# Altium PCB IMU to servo.pcbdoc
Units mil, origin at the board's own origin, x right, y up, seen from the top; angles counter-clockwise.
Board outline 1070.87 x 1248.03 mil, 2 copper layers (Top Layer, Bottom Layer), stack 62.206 mil thick; 35 components, 27 nets, 116 pads, 48 vias.
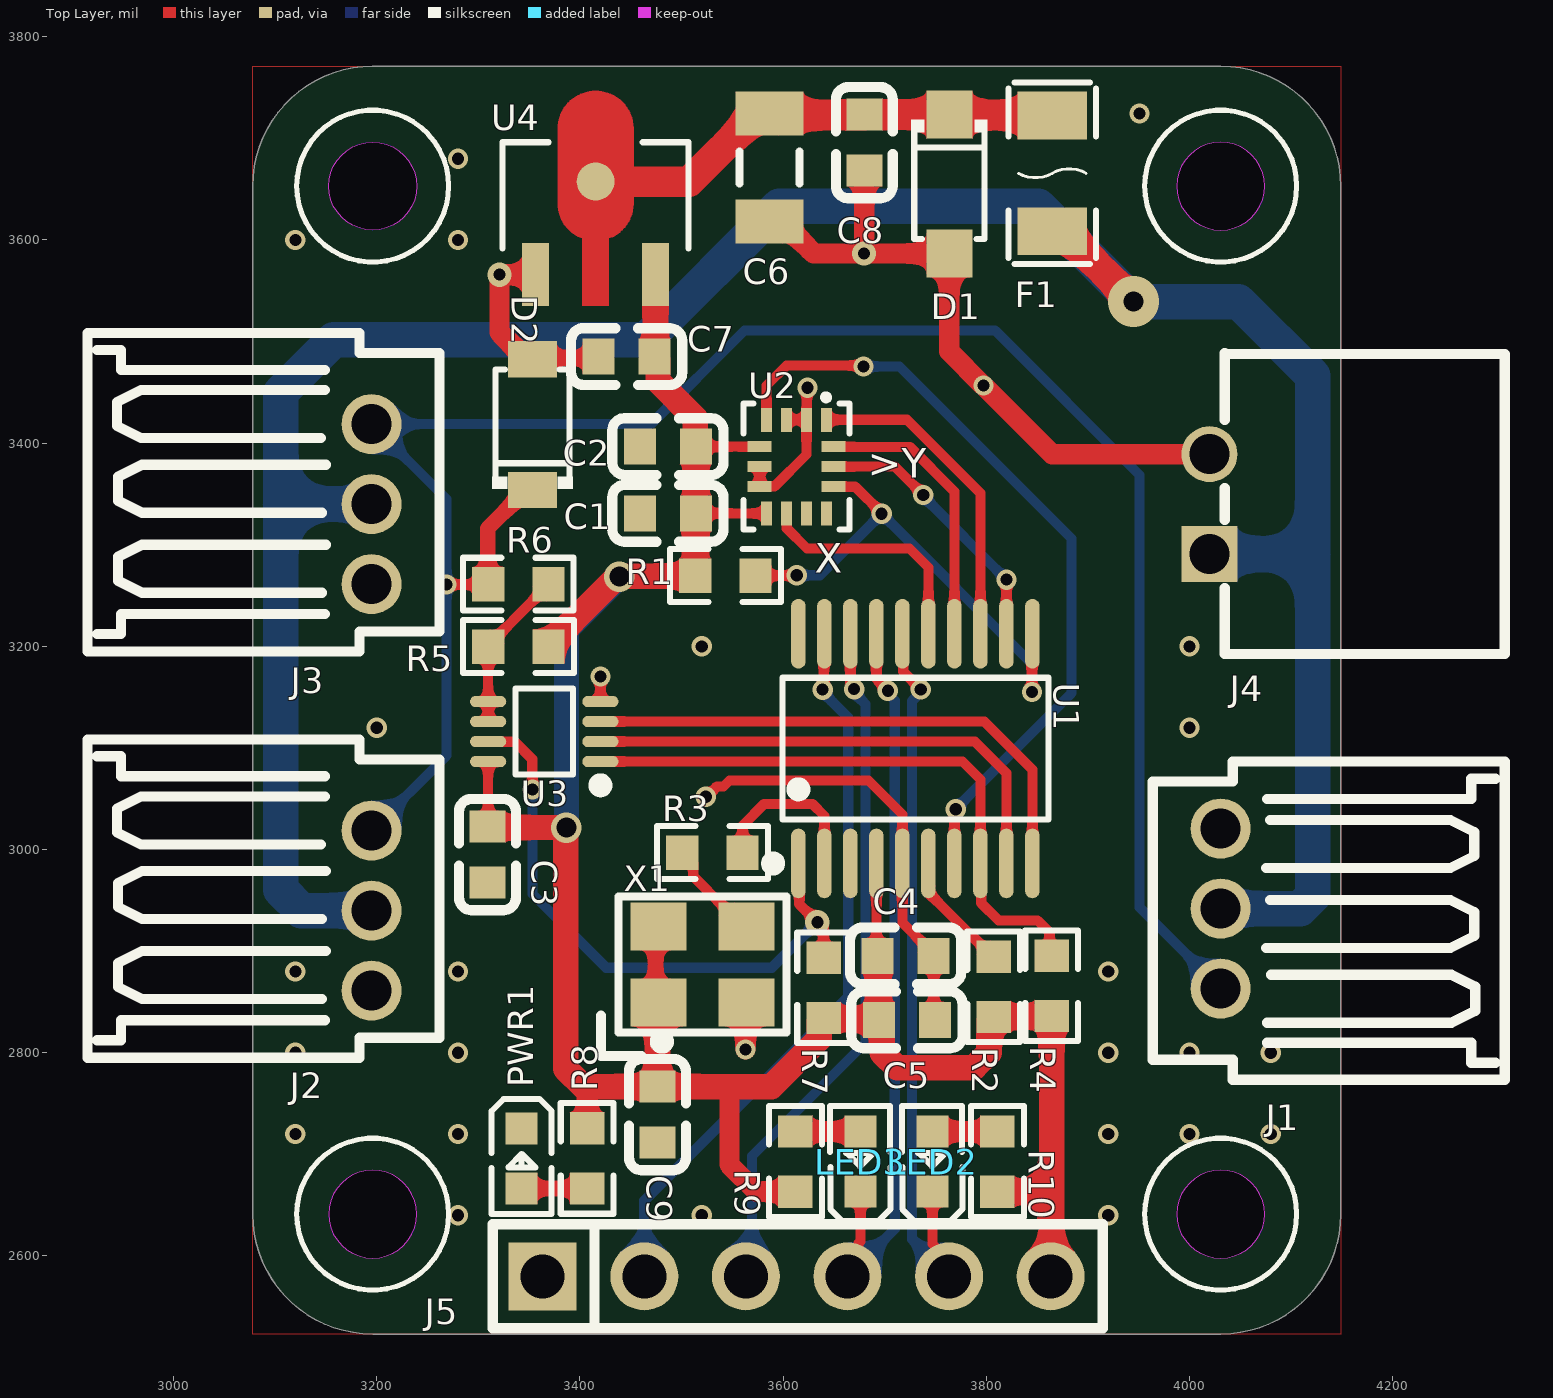
[diagram p0: Top Layer view]
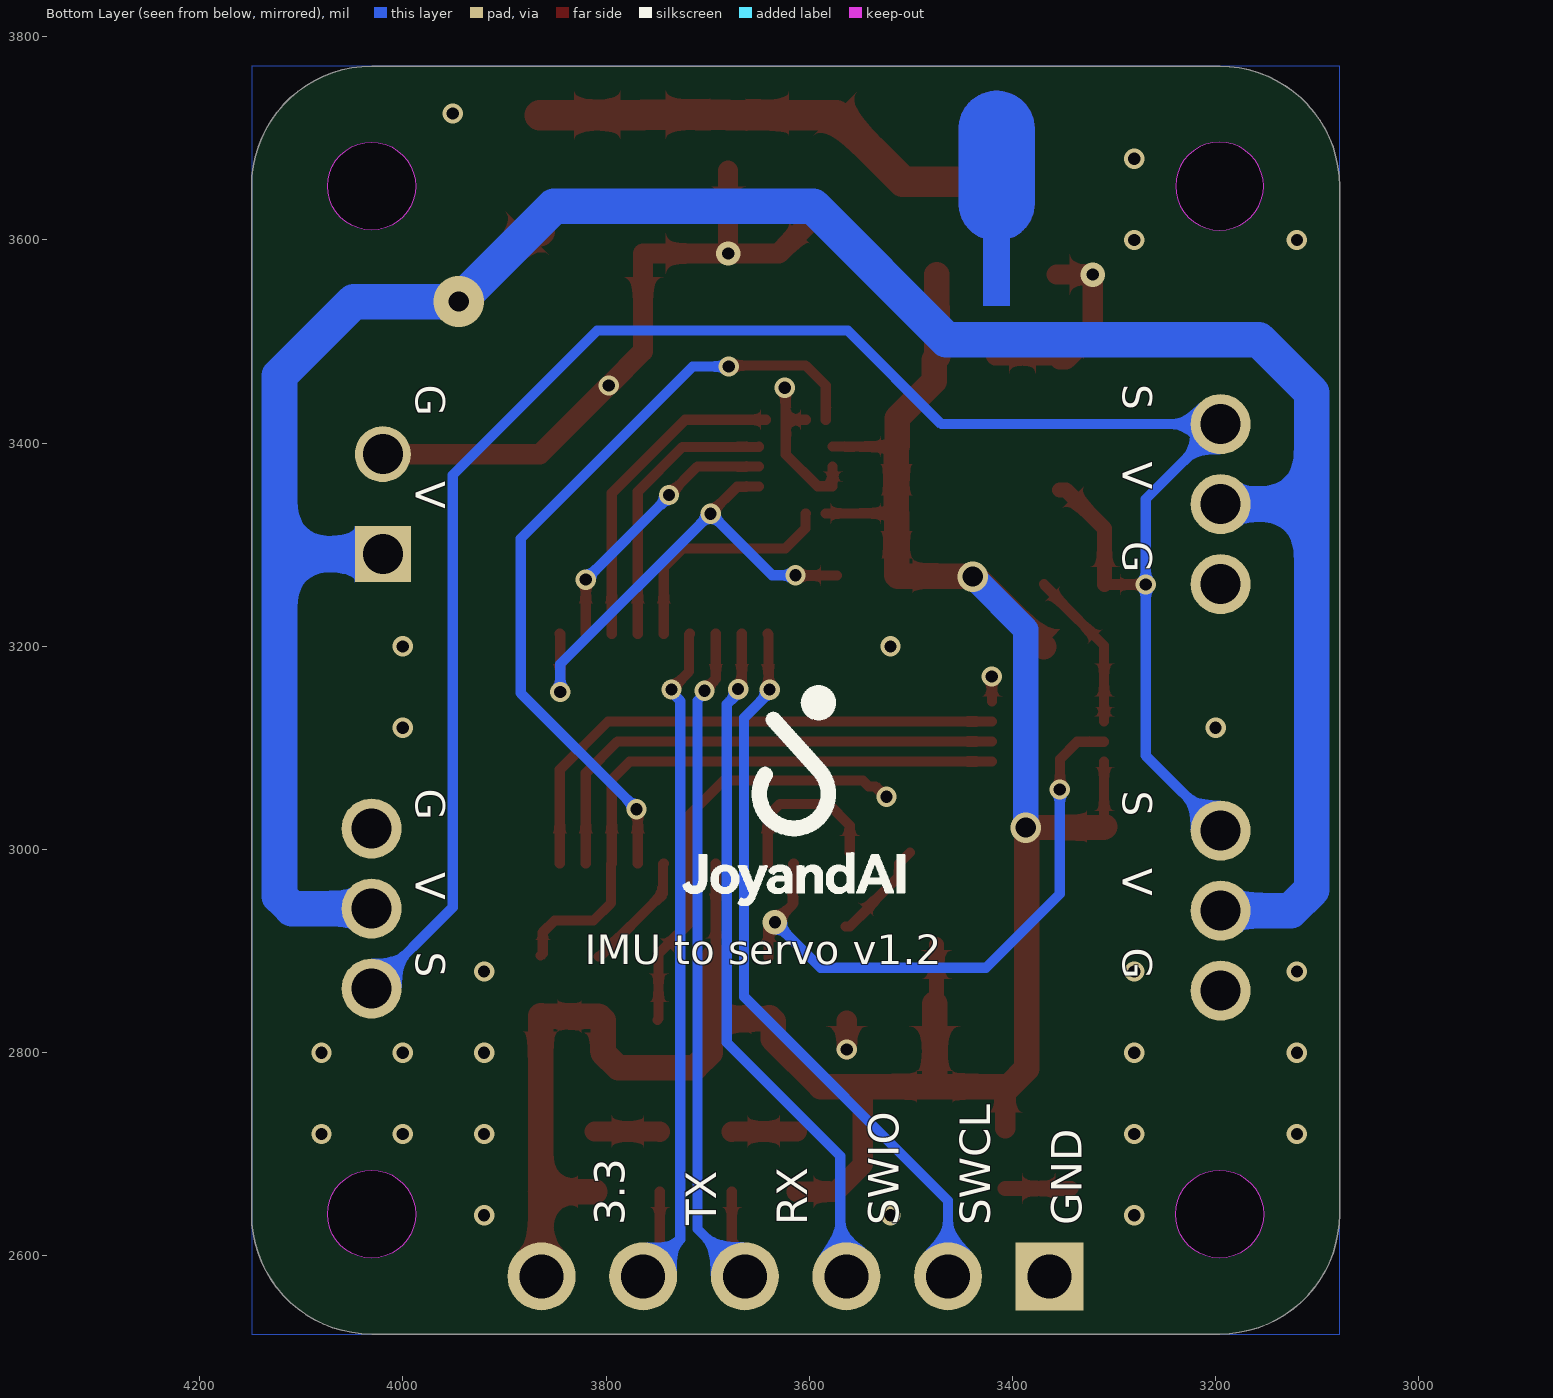
[diagram p1: Bottom Layer view, seen from below]

## Layer stack, top to bottom
Top Solder Mask Layer: solder mask 0.394, Dk 3.3
Top Layer: signal copper 1.379
Dielectric1: surface 59.449, FR4, Dk 4.5
Bottom Layer: signal copper 1.378
Bottom Solder Mask Layer: solder mask 0.394, Dk 3.3

## Board outline
3077.99,2641.2 3077.99,3653.01 cw(c3196.1,3653.01) 3196.1,3771.12 4030.74,3771.12 cw(c4030.74,3653.01) 4148.85,3653.01 4148.85,2641.2 cw(c4030.74,2641.2) 4030.74,2523.09 3196.1,2523.09 cw(c3196.1,2641.2)
cut-out: 3987.43,2641.2 ccw(c4030.74,2641.2) 4030.74,2597.9 ccw(c4030.74,2641.2) 4074.05,2641.2 ccw(c4030.74,2641.2) 4030.74,2684.51 ccw(c4030.74,2641.2)
cut-out: 3152.79,2641.2 ccw(c3196.1,2641.2) 3196.1,2597.9 ccw(c3196.1,2641.2) 3239.4,2641.2 ccw(c3196.1,2641.2) 3196.1,2684.51 ccw(c3196.1,2641.2)
cut-out: 3987.43,3653.01 ccw(c4030.74,3653.01) 4030.74,3609.71 ccw(c4030.74,3653.01) 4074.05,3653.01 ccw(c4030.74,3653.01) 4030.74,3696.32 ccw(c4030.74,3653.01)
cut-out: 3196.1,3609.71 cw(c3196.1,3653.01) 3152.79,3653.01 cw(c3196.1,3653.01) 3196.1,3696.32 cw(c3196.1,3653.01) 3239.4,3653.01 cw(c3196.1,3653.01)

## Design rules (kind name [scope] priority, off if disabled: settings)
BoardOutlineClearance [All] p1: gap=10 ignorepadtopadclearanceinfootprint=FALSE except(0: Arc-SplitContinuation Track-SplitContinuation SMDPad-SplitContinuation THPad-SplitContinuation Via-SplitContinuation Fill-SplitContinuation Poly-SplitContinuation Region-SplitContinuation Text-SplitContinuation)
Clearance PolytoTrackGND [InPoly vs InNet('VDD_F') or InNet('VDD_BUS') or InNet('3.3V')] p1: gap=10 ignorepadtopadclearanceinfootprint=TRUE
Clearance [All] p2: gap=7 ignorepadtopadclearanceinfootprint=TRUE
PlaneConnect [All] p1: planeconnectstyle=Relief reliefexpansion=20 reliefentries=4 reliefconductorwidth=15 reliefairgap=10
PolygonConnect [All] p1: connectstyle=Relief reliefconductorwidth=20 reliefentries=4 polygonreliefangle="90 Angle" airgapwidth=10
RoomDefinition Sheet1 [InComponentClass('Sheet1')] p1: confinementstyle=ConfineIn formatcopy=TRUE lockcomponents=FALSE outline 7045,1060 7915,1060 7915,1580 7045,1580
RoutingVias [All] p1: holewidth=28 width=50 viastyle="Through Hole" minholewidth=28 minwidth=50 maxholewidth=28 maxwidth=50
SolderMaskExpansion [All] p1: expansion=4 istentingtop=FALSE
Width [All] p1: maxlimit=50 minlimit=8 preferedwidth=10 minimp=50.000000 maximp=50.000000 favimp=50.000000
29 further rules are at their usual default settings.

## Components (designator, comment, footprint, x,y, rotation, side; value= is the part's Value field where it differs from the comment)
C1 "100nF" C0603 3486.62,3330.91 r0 top
C2 "100nF" C0603 3486.62,3396.64 r0 top
C3 "100nF" C0603 3309.06,2995.08 r270 top
C4 "100nF" C0603 3720.71,2895.35 r180 top
C5 "4.7uF" C0603 3721.89,2832.42 r180 top
C6 "10uF" C1206 3586.61,3671.38 r270 top
C7 "10uF" C0603 3446.1,3485.24 r180 top
C8 "100nF" C0603 3680,3695.72 r90 top
C9 "100nF" C0603 3476.38,2739.17 r270 top
D1 "SMF18A" SOD-123FL_L2.7-W1.8-LS3.7-RD 3763.65,3654.98 r270 top
D2 "BZT52C5V1-7-F" SOD-123_L2.7-W1.6-LS3.7-RD 3353.35,3418.31 r90 top
F1 "MF-NSMF020X-2" F1206 3865,3665.65 r90 top
J1 "A2007WR-3P" CONN-TH_A2007WR-3P 4030.74,2941.93 r270 top
J2 "A2007WR-3P" CONN-TH_A2007WR-3P 3195,2940.01 r90 top
J3 "A2007WR-3P" CONN-TH_A2007WR-3P 3195,3340 r90 top (schematic designator J5)
J4 "WAFER-XH254WZ-2AM" HDR-TH_2P-P2.50_XY-XH2.54-2A21 4019.68,3340 r90 top
J5 "PZ254V-11-06P" HDR-TH_6P-P2.54-V-M 3613.42,2580 r0 top (schematic designator J3)
LED2 "GL0603UB01" LED0603-RD 3747.05,2692.91 r90 top
LED3 "GL0603UB01" LED0603-RD 3676.18,2692.91 r90 top
PWR1 "GL0603UG01" LED0603-RD 3342.46,2695.88 r270 top
R1 "10kΩ" R0603 3543.31,3269.68 r180 top
R2 "10kΩ" R0603 3807.28,2864.96 r90 top
R3 "33Ω" R0603 3530.51,2997.05 r0 top
R4 "10kΩ" R0603 3864.37,2865.95 r90 top
R5 "10kΩ" R0603 3339.57,3199.8 r180 top
R6 "150Ω" R0603 3339.4,3261.26 r180 top
R7 "10kΩ" R0603 3639.96,2863.98 r270 top
R8 "60.4Ω" R0603 3407.16,2696.1 r270 top (schematic designator R2)
R9 "60.4Ω" R0603 3612.2,2692.91 r270 top (schematic designator R2)
R10 "60.4Ω" R0603 3811.02,2692.91 r270 top (schematic designator R2)
U1 "STM32G031F8P6" TSSOP-20_L6.5-W4.4-P0.65-LS6.4-BL 3730.32,3099.41 r0 top
U2 "LSM6DSV16XTR" LGA-14_L3.0-W2.5-P0.50-BR 3613.19,3376.97 r90 top locked
U3 "SN74LVC2G241DCUR" VSSOP-8_L2.3-W2.0-P0.50-LS3.1-BR 3364.96,3116.14 r0 top
U4 "HT7533-1" SOT-89-3_L4.5-W2.5-P1.50-LS4.2-BR 3415.54,3619.44 r270 top
X1 "16MHz" OSC-SMD_4P-L3.2-W2.5-BL_SIT8008BI 3520.67,2886.81 r0 top

## Footprints (in the part's own frame and the unit in brackets; to place one, negate y for a bottom-side part, rotate by r counter-clockwise, add the part's x,y. Pads: shape width x height; smd on the part's side, far side on the other; paste and mask are expansions set on the pad)
C0603 [mm]
  rect 0.8x0.9 smd: 1(-0.7,0) 2(0.7,0)
  silkscreen extent -1.39,-0.71 1.39,0.71
C1206 [mm] "Chip Capacitor, Body 3.2x1.6mm, IPC High Density"
  rect 1.1x1.7 smd paste-100 mask+0.051: 1(-1.35,0) 2(1.35,0)
  silkscreen extent -0.4,-0.75 0.4,0.75, body extent -1.7,-0.9 1.7,0.9, height 1.3
CONN-TH_A2007WR-3P [mm]
  round 1.5 hole 1: 1(2,0) 2(0,0) 3(-2,0)
  silkscreen extent -3.68,-1.7 4.28,7.1
F1206 [mm]
  rect 1.19x1.728 smd: 1(-1.445,0) 2(1.445,0)
  silkscreen extent -2.27,-1.09 2.27,1.09
HDR-TH_2P-P2.50_XY-XH2.54-2A21 [mm]
  rect 1.4x1.4 hole 1 paste+0 mask+0.05: 1(-1.25,0)
  round 1.4 hole 1 paste+0 mask+0.05: 2(1.25,0)
  silkscreen extent -3.75,-7.38 3.78,-0.38
HDR-TH_6P-P2.54-V-M [mm]
  rect 1.7x1.7 hole 1.1: 1(-6.35,0)
  round 1.7 hole 1.1: 2(-3.81,0) 3(-1.27,0) 4(1.27,0) 5(3.81,0) 6(6.35,0)
  silkscreen extent -7.6,-1.3 7.65,1.3
LED0603-RD [mm]
  rect 0.8x0.8 smd: 1(-0.749,0) 2(0.749,0)
  silkscreen extent -1.49,-0.75 1.39,0.76
LGA-14_L3.0-W2.5-P0.50-BR [mm]
  rect 0.6x0.27 smd: 1(1.17,-0.75) 2(1.17,-0.25) 3(1.17,0.25) 4(1.17,0.75) 8(-1.17,0.75) 9(-1.17,0.25) 10(-1.17,-0.25) 11(-1.17,-0.75)
  rect 0.27x0.6 smd: 5(0.5,0.92) 6(0,0.92) 7(-0.5,0.92) 12(-0.5,-0.92) 13(0,-0.92) 14(0.5,-0.92)
  silkscreen extent -1.58,-1.33 1.8,1.33
OSC-SMD_4P-L3.2-W2.5-BL_SIT8008BI [mm]
  rect 1.4x1.2 smd: 1(-1.1,-0.95) 2(1.1,-0.95) 3(1.1,0.95) 4(-1.1,0.95)
  silkscreen extent -2.54,-2.29 2.1,1.7
R0603 [mil]
  rect 31.75x34.02 smd paste-3937.01 mask+2: 1(-29.66,0) 2(29.66,0)
  silkscreen extent -55,-26 55,26
SOD-123_L2.7-W1.6-LS3.7-RD [mm]
  rect 0.91x1.22 smd: 1(-1.635,0) 2(1.635,0)
  silkscreen extent -1.6,-1 1.38,1
SOD-123FL_L2.7-W1.8-LS3.7-RD [mm]
  rect 1.2x1.15 smd: 1(-1.735,0) 2(1.735,0)
  silkscreen extent -1.6,-0.95 1.38,0.95
SOT-89-3_L4.5-W2.5-P1.50-LS4.2-BR [mm]
  rect 1.575x0.672 smd paste+0 mask+0.051: 1(1.356,-1.5) 3(1.356,1.5)
  round 0.95 smd: 2(-0.966,0)
  Top Layer region: -2.283,0.95 -0.429,0.95 -0.384,0.949 -0.34,0.946 -0.296,0.94 -0.252,0.933 -0.208,0.924 -0.165,0.912 -0.123,0.899 -0.081,0.884 -0.04,0.866 0,0.847 0.04,0.826 0.078,0.803 0.115,0.779 0.151,0.752 0.185,0.724 0.219,0.695 0.251,0.664 0.281,0.631 0.31,0.597 0.337,0.562 0.362,0.525 0.386,0.488 0.408,0.449 0.428,0.409 0.447,0.33 2.144,0.33 2.144,-0.33 0.447,-0.33 0.428,-0.409 0.408,-0.449 0.386,-0.488 0.362,-0.526 0.337,-0.562 0.31,-0.597 0.281,-0.631 0.251,-0.664 0.219,-0.695 0.185,-0.725 0.151,-0.753 0.115,-0.779 0.078,-0.804 0.04,-0.827 0,-0.848 -0.04,-0.867 -0.081,-0.884 -0.123,-0.899 -0.165,-0.913 -0.208,-0.924 -0.252,-0.934 -0.296,-0.941 -0.34,-0.946 -0.384,-0.949 -0.429,-0.95 -2.283,-0.95 -2.328,-0.949 -2.372,-0.946 -2.416,-0.941 -2.46,-0.934 -2.504,-0.924 -2.547,-0.913 -2.589,-0.899 -2.631,-0.884 -2.672,-0.867 -2.713,-0.848 -2.752,-0.827 -2.79,-0.804 -2.827,-0.779 -2.863,-0.753 -2.898,-0.725 -2.931,-0.695 -2.963,-0.664 -2.993,-0.631 -3.022,-0.597 -3.049,-0.562 -3.075,-0.526 -3.098,-0.488 -3.12,-0.449 -3.141,-0.409 -3.159,-0.369 -3.175,-0.327 -3.189,-0.285 -3.202,-0.242 -3.212,-0.199 -3.22,-0.155 -3.227,-0.111 -3.231,-0.067 -3.233,-0.022 -3.233,0.022 -3.231,0.067 -3.227,0.111 -3.22,0.155 -3.212,0.199 -3.202,0.242 -3.189,0.285 -3.175,0.327 -3.159,0.369 -3.141,0.409 -3.12,0.449 -3.098,0.488 -3.075,0.525 -3.049,0.562 -3.022,0.597 -2.993,0.631 -2.963,0.664 -2.931,0.695 -2.898,0.724 -2.863,0.752 -2.827,0.779 -2.79,0.803 -2.752,0.826 -2.713,0.847 -2.672,0.866 -2.631,0.884 -2.589,0.899 -2.547,0.912 -2.504,0.924 -2.46,0.933 -2.416,0.94 -2.372,0.946 -2.328,0.949 -2.283,0.95
  Bottom Layer region: -2.283,0.95 -0.429,0.95 -0.384,0.949 -0.34,0.946 -0.296,0.94 -0.252,0.933 -0.208,0.924 -0.165,0.912 -0.123,0.899 -0.081,0.884 -0.04,0.866 0,0.847 0.04,0.826 0.078,0.803 0.115,0.779 0.151,0.752 0.185,0.724 0.219,0.695 0.251,0.664 0.281,0.631 0.31,0.597 0.337,0.562 0.362,0.525 0.386,0.488 0.408,0.449 0.428,0.409 0.447,0.33 2.144,0.33 2.144,-0.33 0.447,-0.33 0.428,-0.409 0.408,-0.449 0.386,-0.488 0.362,-0.526 0.337,-0.562 0.31,-0.597 0.281,-0.631 0.251,-0.664 0.219,-0.695 0.185,-0.725 0.151,-0.753 0.115,-0.779 0.078,-0.804 0.04,-0.827 0,-0.848 -0.04,-0.867 -0.081,-0.884 -0.123,-0.899 -0.165,-0.913 -0.208,-0.924 -0.252,-0.934 -0.296,-0.941 -0.34,-0.946 -0.384,-0.949 -0.429,-0.95 -2.283,-0.95 -2.328,-0.949 -2.372,-0.946 -2.416,-0.941 -2.46,-0.934 -2.504,-0.924 -2.547,-0.913 -2.589,-0.899 -2.631,-0.884 -2.672,-0.867 -2.713,-0.848 -2.752,-0.827 -2.79,-0.804 -2.827,-0.779 -2.863,-0.753 -2.898,-0.725 -2.931,-0.695 -2.963,-0.664 -2.993,-0.631 -3.022,-0.597 -3.049,-0.562 -3.075,-0.526 -3.098,-0.488 -3.12,-0.449 -3.141,-0.409 -3.159,-0.369 -3.175,-0.327 -3.189,-0.285 -3.202,-0.242 -3.212,-0.199 -3.22,-0.155 -3.227,-0.111 -3.231,-0.067 -3.233,-0.022 -3.233,0.022 -3.231,0.067 -3.227,0.111 -3.22,0.155 -3.212,0.199 -3.202,0.242 -3.189,0.285 -3.175,0.327 -3.159,0.369 -3.141,0.409 -3.12,0.449 -3.098,0.488 -3.075,0.525 -3.049,0.562 -3.022,0.597 -2.993,0.631 -2.963,0.664 -2.931,0.695 -2.898,0.724 -2.863,0.752 -2.827,0.779 -2.79,0.803 -2.752,0.826 -2.713,0.847 -2.672,0.866 -2.631,0.884 -2.589,0.899 -2.547,0.912 -2.504,0.924 -2.46,0.933 -2.416,0.94 -2.372,0.946 -2.328,0.949 -2.283,0.95
  Multi-Layer region: -2.283,0.95 -0.429,0.95 -0.384,0.949 -0.34,0.946 -0.296,0.94 -0.252,0.933 -0.208,0.924 -0.165,0.912 -0.123,0.899 -0.081,0.884 -0.04,0.866 0,0.847 0.04,0.826 0.078,0.803 0.115,0.779 0.151,0.752 0.185,0.724 0.219,0.695 0.251,0.664 0.281,0.631 0.31,0.597 0.337,0.562 0.362,0.525 0.386,0.488 0.408,0.449 0.428,0.409 0.447,0.33 2.144,0.33 2.144,-0.33 0.447,-0.33 0.428,-0.409 0.408,-0.449 0.386,-0.488 0.362,-0.526 0.337,-0.562 0.31,-0.597 0.281,-0.631 0.251,-0.664 0.219,-0.695 0.185,-0.725 0.151,-0.753 0.115,-0.779 0.078,-0.804 0.04,-0.827 0,-0.848 -0.04,-0.867 -0.081,-0.884 -0.123,-0.899 -0.165,-0.913 -0.208,-0.924 -0.252,-0.934 -0.296,-0.941 -0.34,-0.946 -0.384,-0.949 -0.429,-0.95 -2.283,-0.95 -2.328,-0.949 -2.372,-0.946 -2.416,-0.941 -2.46,-0.934 -2.504,-0.924 -2.547,-0.913 -2.589,-0.899 -2.631,-0.884 -2.672,-0.867 -2.713,-0.848 -2.752,-0.827 -2.79,-0.804 -2.827,-0.779 -2.863,-0.753 -2.898,-0.725 -2.931,-0.695 -2.963,-0.664 -2.993,-0.631 -3.022,-0.597 -3.049,-0.562 -3.075,-0.526 -3.098,-0.488 -3.12,-0.449 -3.141,-0.409 -3.159,-0.369 -3.175,-0.327 -3.189,-0.285 -3.202,-0.242 -3.212,-0.199 -3.22,-0.155 -3.227,-0.111 -3.231,-0.067 -3.233,-0.022 -3.233,0.022 -3.231,0.067 -3.227,0.111 -3.22,0.155 -3.212,0.199 -3.202,0.242 -3.189,0.285 -3.175,0.327 -3.159,0.369 -3.141,0.409 -3.12,0.449 -3.098,0.488 -3.075,0.525 -3.049,0.562 -3.022,0.597 -2.993,0.631 -2.963,0.664 -2.931,0.695 -2.898,0.724 -2.863,0.752 -2.827,0.779 -2.79,0.803 -2.752,0.826 -2.713,0.847 -2.672,0.866 -2.631,0.884 -2.589,0.899 -2.547,0.912 -2.504,0.924 -2.46,0.933 -2.416,0.94 -2.372,0.946 -2.328,0.949 -2.283,0.95
  silkscreen extent -1.95,-2.33 0.7,2.33
TSSOP-20_L6.5-W4.4-P0.65-LS6.4-BL [mil]
  oval 14.33x68.58 smd: 1(-115.16,-113.03) 2(-89.57,-113.03) 3(-63.98,-113.03) 4(-38.39,-113.03) 5(-12.79,-113.03) 6(12.8,-113.03) 7(38.39,-113.03) 8(63.98,-113.03) 9(89.57,-113.03) 10(115.16,-113.03) 11(115.16,113.03) 12(89.57,113.03) 13(63.98,113.03) 14(38.39,113.03) 15(12.8,113.03) 16(-12.79,113.03) 17(-38.39,113.03) 18(-63.98,113.03) 19(-89.57,113.03) 20(-115.16,113.03)
  silkscreen extent -146,-119 131,70
VSSOP-8_L2.3-W2.0-P0.50-LS3.1-BR [mm]
  oval 0.905x0.28 smd: 1(1.403,-0.75) 2(1.403,-0.25) 3(1.403,0.25) 4(1.403,0.75) 5(-1.403,0.75) 6(-1.403,0.25) 7(-1.403,-0.25) 8(-1.403,-0.75)
  silkscreen extent -0.72,-1.49 1.55,1.08

## Via types
v1: diameter 20, hole 12, Top Layer to Bottom Layer, 42 vias
v2: diameter 24, hole 12, Top Layer to Bottom Layer, 3 vias
v3: diameter 30, hole 20, Top Layer to Bottom Layer, 2 vias
v4: diameter 50, hole 20, Top Layer to Bottom Layer, 1 vias

## Nets (pads, with @x,y where several pads share a name; then routed paths per layer and width w, separated by ;. In a path a pad name is that pad's centre, name@x,y a point inside that pad or via, vN(x,y) a via of type N, cw(c..) or ccw(c..) an arc to the next point about the centre after c; other vN are vias at no path point)
3.3V: C1.2 C2.2 C3.1 C4.2 C5.2 C7.1 C9.1 J5.6 R1.2 R2.1 R4.1 R5.1 R7.2 R8.1 R9.2 R10.2 U1.4 U2.5 U2.8 U3.8 U4.3 X1.1 X1.4 | length 2668.2
  Top Layer w10: C3.1 3309.74,3023.32 U3.8 ; C1.2@3513.91,3330.64 C1.2 U2.8 ; C2.2 U2.5 ; U1.4 3691.93,2896.57 C4.2
  Top Layer w15: X1.1@3474.6,2848.43 X1.4@3474.6,2906.5
  Top Layer w20: 3403.54,2766.73 3407.16,2763.11 R8.1 ; 3549.21,2766.73 3547.24,2764.76 3547.24,2689.96 3573.95,2663.25 R9.2
  Top Layer w25: C3.1 3310,3021.69 v3(3386.84,3021.69) 3385.98,3020.82 3385.98,2784.3 3403.54,2766.73 C9.1@3474.6,2766.73 ; R5.1 3372.6,3203.18 3372.6,3204.31 3436.04,3267.74 3438.02,3267.74 v3(3438.98,3268.7) 3439.47,3269.19 3512.7,3269.19 3513.68,3270.18 3513.91,3269.95 C1.2@3513.91,3330.64 ; C7.1@3473.59,3485.3 C7.1 3476.91,3481.99 3476.91,3461.09 3513.5,3424.49 3513.5,3397.32 C2.2 C1.2 ; C7.1@3474.6,3486.18 U4.3 ; X1.1@3476.38,2848.43 C9.1 3549.21,2766.73 3588.58,2766.73 3635.45,2813.6 3635.45,2830.94 3638.83,2834.32 R7.2 ; R7.2@3637.88,2833.37 3693.38,2833.37 C5.2@3693.74,2833.01 ; C4.2 3693.74,2894.76 C5.2@3693.74,2833.01 ; R10.2 3864.37,2663.25 ; J5.6 J5.6@3863.42,2611.99 ; J5.6@3864.37,2611.99 3864.37,2663.25 ; C5.2@3693.74,2833.01 C5.2 3697.58,2829.17 3697.58,2800.08 3712.23,2785.43 3788.13,2785.43 3802.78,2800.08 3802.78,2831.93 3806.15,2835.3 R2.1 3807.78,2835.8 3862.74,2835.8 3863.24,2836.29 R4.1 3864.37,2663.25
  Bottom Layer w25: v3(3386.84,3021.69) 3386.84,3216.57 v3(3438.98,3268.7)
$1N175: R3.1 X1.3 | length 101.3
  Top Layer w10: R3.1 3511.69,2986.21 3511.69,2973.78 3541.42,2944.05 3541.42,2942.83 3560.04,2924.21 X1.3
DE: R4.2 U1.8 U3.1 | length 606.2
  Top Layer w10: U3.1 3776.57,3086.61 3794.3,3068.89 U1.8 3795.12,2985.55 3795.12,2947.32 3812.33,2930.11 3850.59,2930.11 3862.19,2918.51 3862.19,2897.79 R4.2
DXL_BUS: D2.1 J1.1 J2.1 J3.1 R6.2 | length 2008.5
  Top Layer w10: v1(3268.7,3260.83) R6.2@3309.31,3260.83 ; R6.2 R6.2@3310.05,3261.57
  Top Layer w15: R6.2@3309.31,3260.83 3309.31,3316 3347.24,3353.93 D2.1
  Bottom Layer w10: J2.1 3268.7,3092.45 v1(3268.7,3260.83) 3268.7,3345.04 J3.1 3258.3,3418.74 3469.92,3418.74 3562.01,3510.83 3808.7,3510.83 3950.79,3368.74 3950.79,2943.15 J1.1
DXL_DATA: R5.2 R6.1 U3.5 U3.6 | length 159.8
  Top Layer w10: U3.6 U3.5 3309.74,3199.64 R5.2 3309.91,3200.94 3358.19,3249.21 3358.19,3250.38 R6.1
GND: C1.1 C2.1 C3.2 C4.1 C5.1 C6.2 C7.2 C8.1 C9.2 D1.2 D2.2 J1.3 J2.3 J3.3 J4.2 J5.1 PWR1.1 U1.5 U2.2 U2.3 U2.6 U2.7 U3.4 U4.1 X1.2 | length 1515.2
  Top Layer w10: U3.4 U3.4 3420.23,3170.23 v1(3420.28,3170.28) ; v1(3523.97,3052.01) 3524.82,3052.01 3534.82,3062.01 3541.34,3062.01 3547.24,3067.91 3684.06,3067.91 3717.53,3034.44 U1.5 3717.53,2928.06 3748.27,2897.32 C4.1 3748.27,2833.6 C5.1 ; U2.6 U2.7 3577.28,3357.59 3591.69,3357.59 3623.02,3388.92 U2.2 ; U2.3 U2.2 ; v1(3624.02,3454.52) 3623.34,3453.85 3623.34,3423.35 U2.2
  Top Layer w15: D2.2 3354.62,3483.96 3417.26,3483.96 C7.2
  Top Layer w20: D2.2 3347.24,3482.68 3320.87,3509.06 v2(3320.87,3565.94) 3356.39,3565.94 U4.1 ; v1(3562.99,2803.15) X1.2@3562.99,2831.69 ; C6.2 3598.43,3618.24 3629.99,3586.67 v2(3679.63,3586.67) ; C8.1 3680,3587.04 v2(3679.63,3586.67) ; J4.2 3865.09,3389.21 3797.61,3456.69 v1(3797.24,3456.69) 3763.65,3490.28 D1.2 v2(3679.63,3586.67)
  other v1: 3280,2640 3520,2640 3920,2640 3120,2720 3280,2720 3920,2720 4000,2720 4080,2720 3120,2800 3280,2800 3920,2800 4000,2800 4080,2800 3120,2880 3280,2880 3920,2880 3200,3120 4000,3120 3520,3200 4000,3200 3120,3600 3280,3600 3280,3680 3950.79,3724.41
IMU_INT1: U1.7 U2.4 | length 780.1
  Top Layer w10: U2.4 3583.65,3456.69 3603.49,3476.52 3678,3476.52 v1(3679.13,3475.39) ; U1.7 3768.7,3038.29 v1(3770.05,3039.64)
  Bottom Layer w10: v1(3679.13,3475.39) 3714.57,3475.39 3883.86,3306.1 3883.86,3154.53 3883.86,3153.98 3770.05,3040.18 v1(3770.05,3039.64)
IMU_INT2: U1.15 U2.9 | length 235.4
  Top Layer w10: U2.9 3603.66,3330.59 3603.66,3316.18 3623.57,3296.26 3724.41,3296.26 3743.11,3277.55 U1.15
"LED G": 
LED+: PWR1.2 R8.2 | length 64.7
  Top Layer w15: PWR1.2 R8.2@3407.14,2666.42
MCU_RX: U1.10 U3.3 | length 537.1
  Top Layer w10: U3.3 3798.05,3125.98 3845.47,3078.56 U1.10
MCU_TX: U1.9 U3.2 | length 501.4
  Top Layer w10: U3.2 3788.8,3106.3 3819.89,3075.22 U1.9
NRST: R2.2 U1.6 | length 119
  Top Layer w10: U1.6 3743.94,2985.55 3743.94,2956.83 3806.15,2894.62 R2.2
OSC_IN: R3.2 U1.2 | length 167.7
  Top Layer w10: R3.2 3560.17,3023.75 3581.43,3045.01 3628.73,3045.01 3640.74,3032.99 U1.2
RX_EN: R7.1 U1.1 U3.7 | length 615.6
  Top Layer w10: U3.7 3309.94,3106.11 3336.14,3106.11 3353.19,3089.06 3353.19,3059.21 v1(3353.35,3059.06) ; U1.1 3615.98,2985.55 3615.98,2946.35 v2(3633.82,2928.52) 3633.82,2924.73 3639.96,2918.58 R7.1
  Bottom Layer w10: v1(3353.35,3059.06) 3353.35,2956.31 3425.99,2883.67 3588.96,2883.67 v2(3633.82,2928.52)
RX_LED+: LED3.2 R9.1 | length 64
  Top Layer w20: R9.1 3612.29,2722.49 3676.09,2722.49 LED3.2
SPI_CS: R1.1 U1.11 U2.12 | length 502.6
  Top Layer w10: R1.1 3613.14,3269.68 v1(3613.42,3269.96) ; U2.12 3670.97,3357.27 3697.05,3331.2 v1(3697.05,3330.59) ; v1(3844.98,3155.14) 3844.98,3211.95 U1.11
  Bottom Layer w10: v1(3613.42,3269.96) 3636.42,3269.96 v1(3697.05,3330.59) 3844.98,3182.66 v1(3844.98,3155.14)
SPI_MISO: U1.13 U2.1 | length 319.8
  Top Layer w10: U2.1 3722.01,3423.03 3794.3,3350.74 U1.13
SPI_MOSI: U1.14 U2.14 | length 277.5
  Top Layer w10: U2.14 3649.72,3396.33 3724.66,3396.33 3768.7,3352.29 U1.14
SPI_SCK: U1.12 U2.13 | length 270.7
  Top Layer w10: U2.13 3710.09,3376.96 v1(3737.99,3349.06) ; U1.12 v1(3819.88,3265.73)
  Bottom Layer w10: v1(3737.99,3349.06) 3737.99,3347.62 v1(3819.88,3265.73)
SWDCLK: J5.2 U1.19 | length 726.7
  Top Layer w10: v1(3638.95,3157.47) 3639.92,3158.43 3639.92,3211.61 U1.19
  Bottom Layer w10: J5.2 3463.42,2654.36 3664.1,2855.05 3664.1,3129.86 3638.95,3155 v1(3638.95,3157.47)
SWDIO: J5.3 U1.18 | length 687.3
  Top Layer w10: U1.18 3666.38,3212.39 3666.38,3165.31 3669.95,3161.74 v1(3669.95,3157.95)
  Bottom Layer w10: J5.3 3569.4,2585.99 3569.4,2698.34 3681.1,2810.04 3681.1,3143.01 3669.95,3154.16 v1(3669.95,3157.95)
TX_LED+: LED2.2 R10.1 | length 64.1
  Top Layer w20: LED2.2 3747.13,2722.49 3810.94,2722.49 R10.1
UART_RX: J5.4 LED3.1 U1.17 | length 747.9
  Top Layer w10: J5.4 3674.31,2590.89 3674.31,2612.45 3676.19,2614.32 LED3.1 ; U1.17 3691.93,3167.83 3703.14,3156.61 v1(3703.14,3156.38)
  Bottom Layer w10: J5.4 3710.01,2626.59 3710.01,3146.81 3703.14,3153.68 v1(3703.14,3156.38)
UART_TX: J5.5 LED2.1 U1.16 | length 748.8
  Top Layer w10: U1.16 3718.35,3211.61 3718.35,3175.11 3735.58,3157.89 v1(3735.58,3157.6) ; LED2.1 3747.05,2611.77 3763.42,2595.4 J5.5
  Bottom Layer w10: v1(3735.58,3157.6) 3735.58,3154.89 3727.01,3146.33 3727.01,2616.41 J5.5
VDD_BUS: F1.1 J1.2 J2.2 J3.2 J4.1 | length 2655.8
  Top Layer w30: F1.1 3875.59,3608.76 3884.02,3600.33 3884.02,3600.24 v4(3944.88,3539.37)
  Bottom Layer w35: J2.2 3125.99,2940 3105.49,2960.5 3105.49,3340 ; J3.2 3105.49,3340 ; J4.1 4121.35,3290.79 ; J1.2 4109.05,2941.93 4121.35,2954.23 4121.35,3290.79 ; 3105.49,3340 3105.49,3449.8 3157.65,3501.97 3465.04,3501.97 3596.15,3633.08 3851.17,3633.08 v4(3944.88,3539.37) 4048.23,3539.37 4121.35,3466.25 4121.35,3290.79
VDD_F: C6.1 C8.2 D1.1 F1.2 U4.2 | length 477
  Top Layer w30: U4.2 3507.75,3657.48 3573.18,3722.91 3679.63,3722.91 C8.2 D1.1 3764.03,3722.91 3864.63,3722.91 F1.2
pads on no net: U1.3 U1.20 U2.10 U2.11

## Polygon pours and split planes (outlines as drawn)
GND on Top Layer "NONET_L01_P005" (solid, shelved, pour order 5): 3077.99,2523.09 3077.99,3771.12 4148.85,3771.12 4148.85,2523.09
GND on Bottom Layer "NONET_L02_P006" (solid, shelved, pour order 6): 3077.99,2523.09 3077.99,3771.12 4148.85,3771.12 4148.85,2523.09

## Other copper
Top Layer:
  pour cut-out: 3357.28,3513.19 3357.28,3771.65 3475.39,3771.65 3475.39,3513.19
Bottom Layer:
  pour cut-out: 3357.28,3513.19 3357.28,3771.65 3475.39,3771.65 3475.39,3513.19

## Silkscreen, mask and mechanical layers (free items; w line width, h text height)
Top Silkscreen Layer:
  circle w5: c3196.1,2641.2 r74.8
  circle w5: c3196.1,3653.01 r74.8
  circle w5: c4030.74,3653.01 r74.8
  circle w5: c4030.74,2641.2 r74.8
  text ">Y" at 3683.18,3355.92 h50
  text "X" at 3631.22,3262.42 h50
Bottom Silkscreen Layer:
  drawing of 10 lines, arcs and shapes, not listed
  text "S    V    G" at 3301.36,3458.08 h50 r90
  text "G     V" at 3997.12,3457.65 h50 r90
  text "G    V    S" at 3997.12,3060.01 h50 r90
  text "S    V    G" at 3301.36,3058.08 h50 r90
  text "IMU to servo v1.2" at 3820.87,2877.41 h50
  text "3.3 /  / TX /  / RX /  / SWIO /  / SWCL /  / GND" at 3331.7,2630 h30 r270
Mechanical Layer:
  circle w0.5: c4030.74,2641.2 r43.31
  circle w0.5: c3196.1,2641.2 r43.31
  circle w0.5: c4030.74,3653.01 r43.31
  circle w0.5: c3196.1,3653.01 r43.31
  lines w0.5: 3077.99,2641.2 ccw(c3196.1,2641.2) 3196.1,2523.09 4030.74,2523.09 ccw(c4030.74,2641.2) 4148.85,2641.2 4148.85,3653.01 ccw(c4030.74,3653.01) 4030.74,3771.12 3196.1,3771.12 ccw(c3196.1,3653.01) 3077.99,3653.01 3077.99,2641.2